# Altium PCB PCBintentoFinalUlt.PcbDoc
Units mil, origin at the board's own origin, x right, y up, seen from the top; angles counter-clockwise.
Board outline 2900 x 4000 mil, 2 copper layers (Top Layer, Bottom Layer); 36 components, 31 nets, 173 pads, 9 vias.
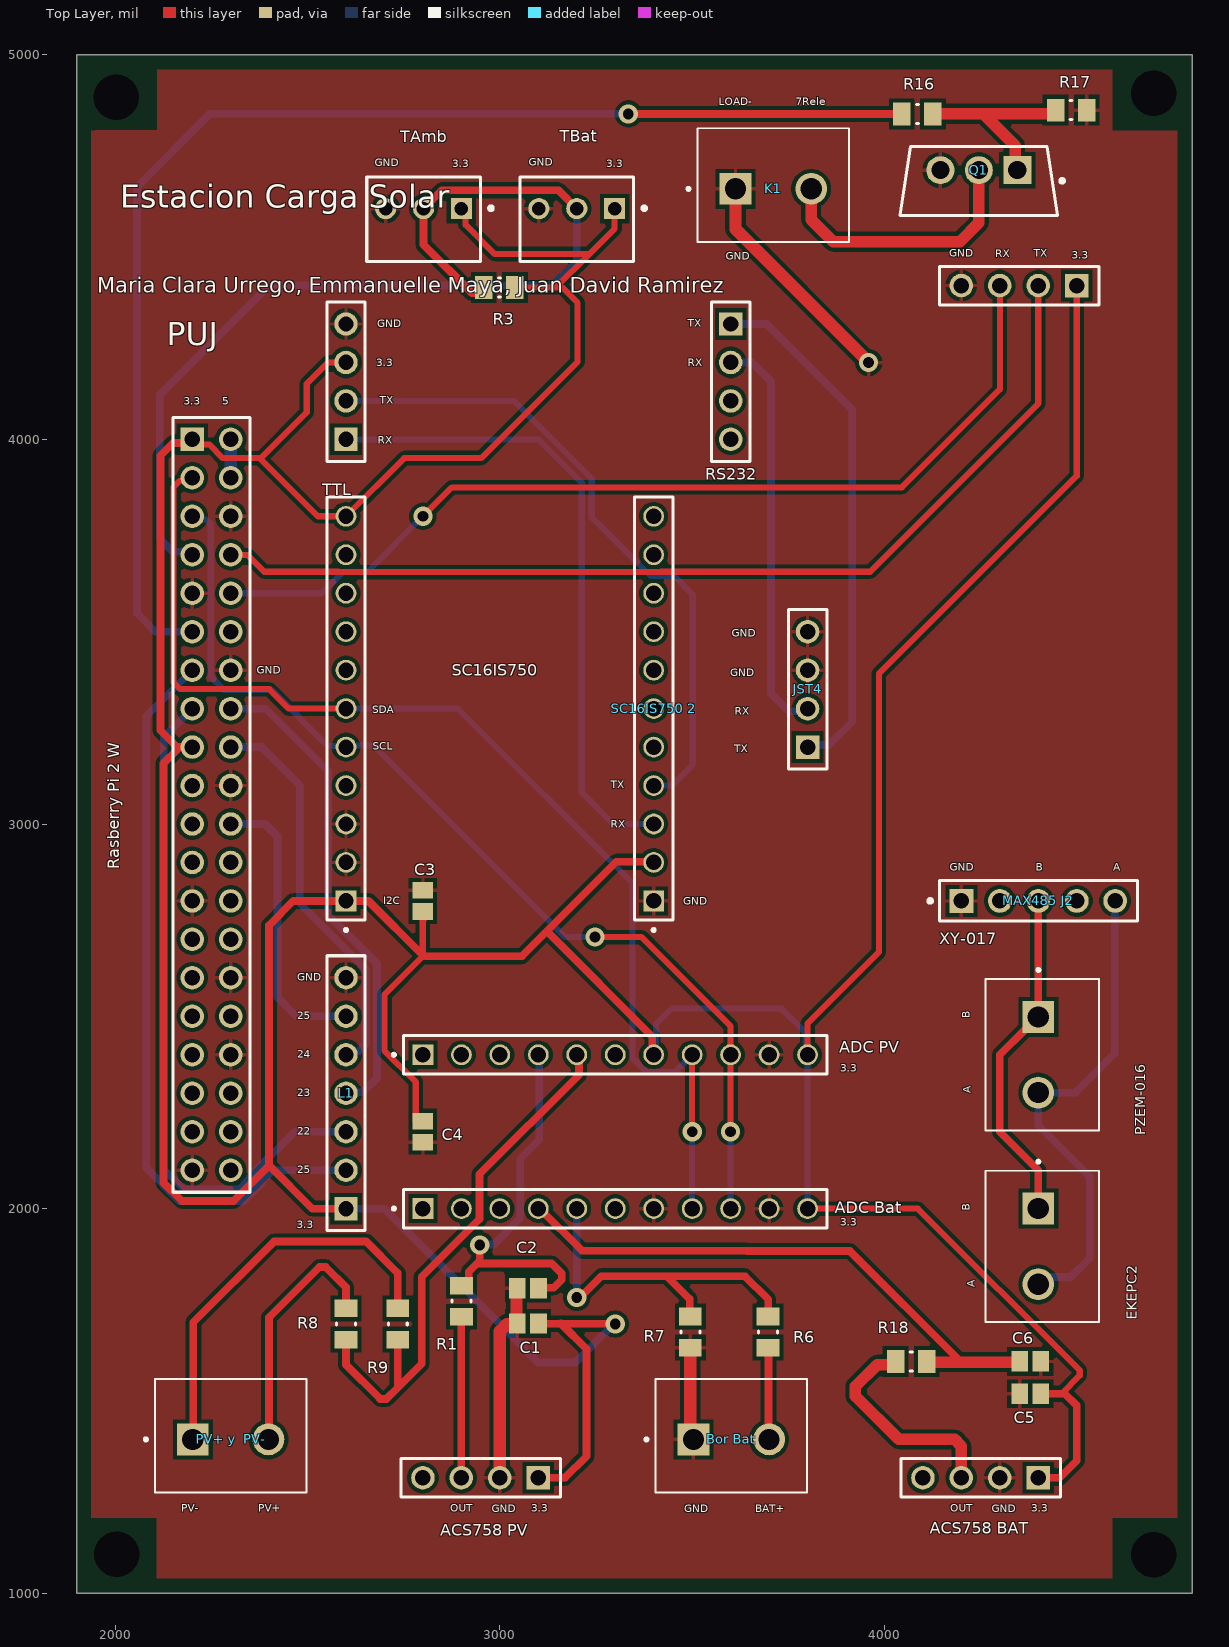
[diagram p0: Top Layer view]
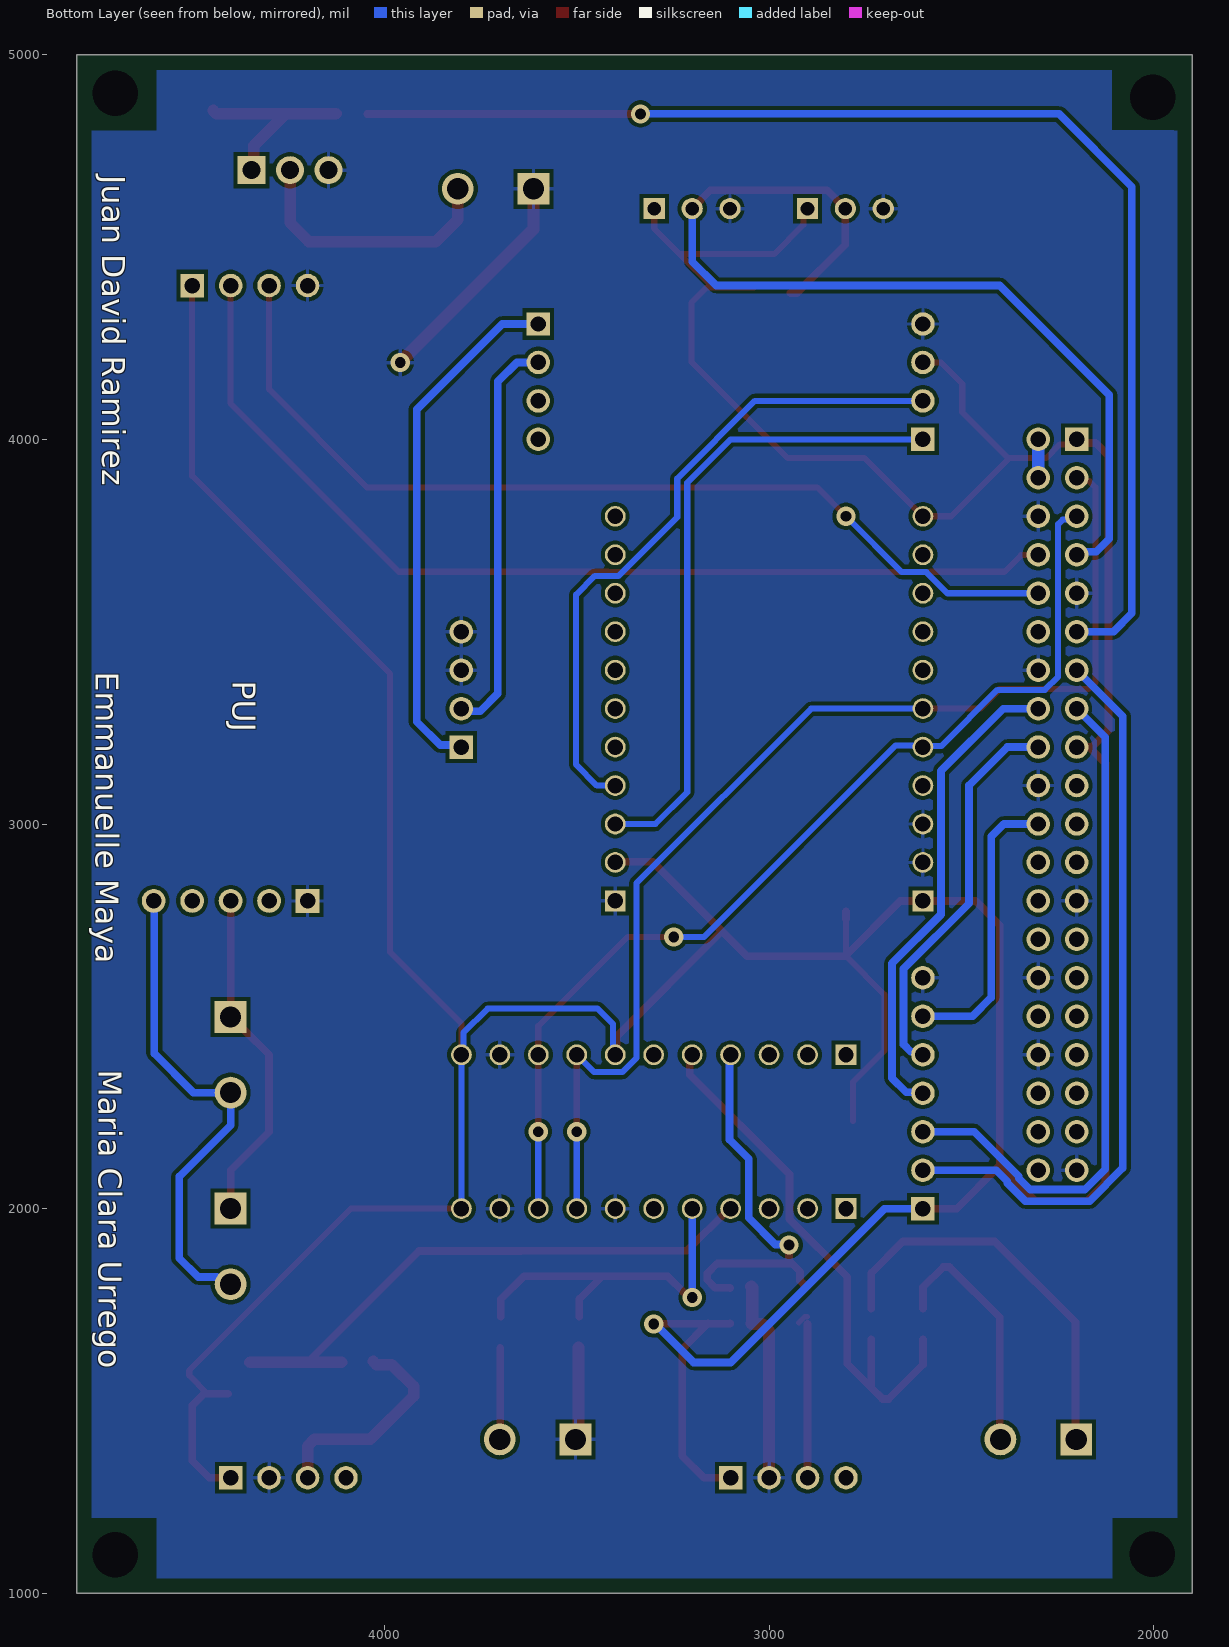
[diagram p1: Bottom Layer view, seen from below]
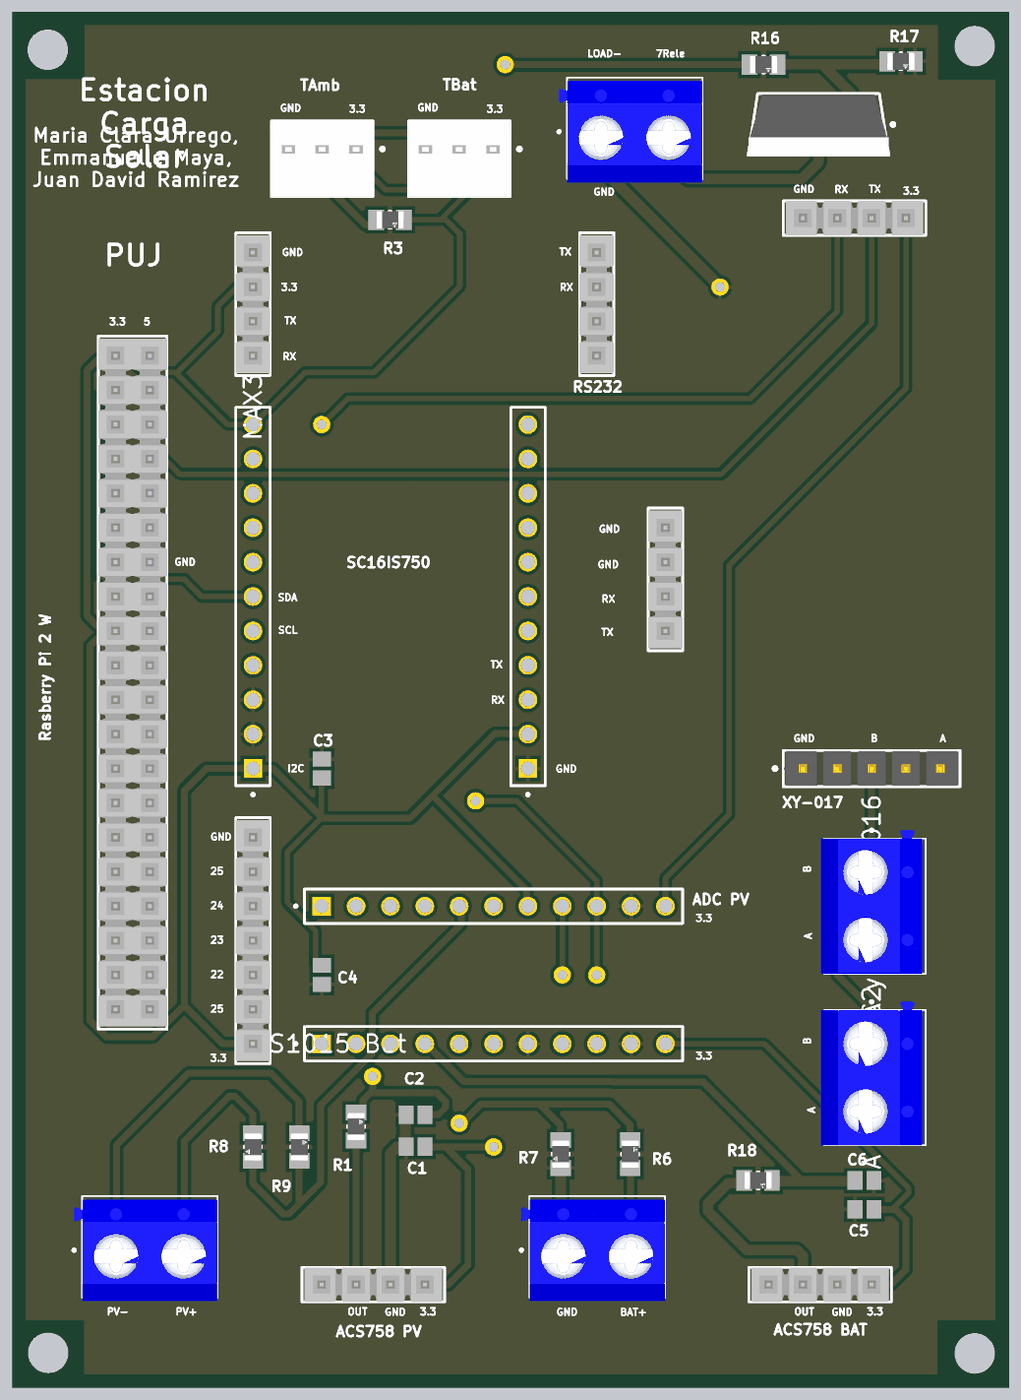
[diagram p2: 3D render of the assembled board from above, using the file's embedded part models]

## Layer stack, top to bottom
Top Solder: solder mask 0.4, Solder Resist, Dk 3.5
Top Layer: signal copper 1.4
Dielectric 1: dielectric 12.6, FR-4, Dk 4.8
Bottom Layer: signal copper 1.4
Bottom Solder: solder mask 0.4, Solder Resist, Dk 3.5

## Board outline
1900,5000 4800,5000 4800,1000 1900,1000

## Design rules (kind name [scope] priority, off if disabled: settings)
AcuteAngle [All] p1: minimum=4.50000000000000E+0001 checktracksonly=FALSE
BoardOutlineClearance [All] p1: gap=31.5 ignorepadtopadclearanceinfootprint=FALSE
Clearance [All] p1: gap=10 ignorepadtopadclearanceinfootprint=FALSE
HoleSize [All] p1: absolutevalues=TRUE maxlimit=393.7 minlimit=15.75 maxpercent=80.000 minpercent=20.000
MinimumAnnularRing [All] p1: minimumring=10
PolygonConnect [All] p1: connectstyle=Relief reliefconductorwidth=10 reliefentries=4 polygonreliefangle="90 Angle" airgapwidth=10
RoutingVias [All] p1: holewidth=28 width=50 viastyle="Through Hole" minholewidth=28 minwidth=50 maxholewidth=28 maxwidth=50
SolderMaskExpansion [All] p1: expansion=0 istentingtop=FALSE
SupplyNets "Schematic Supply Nets_2" [InNet('GND')] p1: voltage=0.000
SupplyNets "Schematic Supply Nets_7" [InNet('+3.3')] p2: voltage=0.000
SupplyNets "Schematic Supply Nets_5" [InNet('PV-')] p3: voltage=0.000
SupplyNets "Schematic Supply Nets_4" [InNet('+5')] p4: voltage=0.000
SupplyNets "Schematic Supply Nets_3" [InNet('PV+')] p5: voltage=0.000
SupplyNets "Schematic Supply Nets" [InNet('BAT+')] p6: voltage=0.000
Width [All] p1: maxlimit=40 minlimit=9.84 preferedwidth=32 minimp=50.000000 maximp=50.000000 favimp=50.000000
29 further rules are at their usual default settings.

## Classes and differential pairs
component class Esquematico_Tesis: "ACS758 BAT" "ACS758 PV" "ADC PV" "Bor Bat" C1 C2 C3 C4 C5 C6 EKEPC2 JST4 L1 "MAX485 J2" "PV+ y  PV-" PZEM-016 Q1 R1 R3 R6 R7 R8 R9 R16 R17 R18 "Rasberry Pi 2 W" RS232 SC16IS750 "SC16IS750 2" Tamb TBat TTL XY-017

## Components (designator, comment, footprint, x,y, rotation, side; value= is the part's Value field where it differs from the comment)
"ACS758 BAT" "Header 4" SMTC-TSW-104-08-X-S 4400,1300 r180 top (schematic designator "ACS758 I_BAT")
"ACS758 PV" "Header 4" SMTC-TSW-104-08-X-S 3100,1300 r180 top (schematic designator "ACS758 I_PV")
"ADC Bat" "Header 11" SAMTEC_TSW-111-24-S-S 2800,2000 r0 top (schematic designator "ADS1015 Bat")
"ADC PV" "Header 11" SAMTEC_TSW-111-24-S-S 2800,2400 r0 top (schematic designator "ADS1015 Panel")
"Bor Bat" "Bornera 2" HANDSON_KF301-2P 3601.57,1400 r0 top
C1 "C0805 0.1u" CAPC2013X88X50LL20T25 3073.03,1701.27 r0 top
C2 "C0805 10n" CAPC2013X88X50LL20T25 3073.03,1793.39 r180 top
C3 "C0805 0.1u" CAPC2013X88X50LL20T25 2800,2800 r270 top
C4 "C0805 0.1u" CAPC2013X88X50LL20T25 2800,2200 r90 top
C5 "C0805 0.1u" CAPC2013X88X50LL20T25 4379.05,1518.88 r0 top
C6 "C0805 10n" CAPC2013X88X50LL20T25 4379.05,1602.63 r0 top
EKEPC2 "Bornera 2" HANDSON_KF301-2P 4400,1901.57 r270 top (schematic designator "A y B EKEPC2")
JST4 "Header 4" SMTC-TSW-104-08-X-S 3800,3200 r90 top
K1 "Bornera 2" HANDSON_KF301-2P 3711.01,4651.43 r0 top
L1 "TSW-107-05-G-S" SMTC-TSW-107-05-X-S 2600,2000 r90 top
"MAX485 J2" "Header 5" FP-TSW-105-22-G-S-MFG 4400,2800 r0 top
"PV+ y  PV-" "Bornera 2" HANDSON_KF301-2P 2300,1400 r0 top
PZEM-016 "Bornera 2" HANDSON_KF301-2P 4400,2400 r270 top (schematic designator "A y B PZEM-016")
Q1 "IRLZ44NPbF" FP-PG-TO220-3-MFG 4245.42,4672.24 r270 top
R1 "R0805 1K" FP-MCU0805-IPC_A 2900,1759.58 r90 top
R3 "R0805 4.7K" FP-MCU0805-IPC_A 2998.86,4395.24 r0 top
R6 "R0805 51K" FP-MCU0805-IPC_A 3697.54,1679.07 r90 top
R7 "R0805 10K" FP-MCU0805-IPC_A 3495.24,1679.07 r270 top
R8 "R0805 200K" FP-MCU0805-IPC_A 2600,1700 r270 top
R9 "R0805 10K" FP-MCU0805-IPC_A 2734.65,1700 r90 top
R16 "R0805 100" FP-MCU0805-IPC_A 4085.56,4846.11 r0 top
R17 "R0805 100k" FP-MCU0805-IPC_A 4485.31,4855.96 r0 top
R18 "R0805 1K" FP-MCU0805-IPC_A 4069.41,1602.63 r0 top
"Rasberry Pi 2 W" "Header Hembra-Macho 40x2" SMTC-TSW-120-24-X-D 2200,4000 r270 top
RS232 "Header 4" SMTC-TSW-104-08-X-S 3600,4300 r270 top (schematic designator "MAX3232 RS232")
SC16IS750 "Header 11" SAMTEC_TSW-111-24-S-S 2600,2800 r90 top (schematic designator "SC16IS750 1")
"SC16IS750 2" "Header 11" SAMTEC_TSW-111-24-S-S 3400,2800 r90 top
TAmb "Header 3 pin" FP-B3P-SHF-1AA_LF_SN-MFG 2801.57,4572.44 r180 top (schematic designator "DS18B20 Amb")
TBat "Header 3 pin" FP-B3P-SHF-1AA_LF_SN-MFG 3200,4572.44 r180 top (schematic designator "DS18B20 Bat")
TTL "Header 4" SMTC-TSW-104-08-X-S 2600,4000 r90 top (schematic designator "MAX3232 TTL")
XY-017 "Header 4" SMTC-TSW-104-08-X-S 4500,4400 r180 top (schematic designator "MAX485 J1")

## Footprints (in the part's own frame and the unit in brackets; to place one, negate y for a bottom-side part, rotate by r counter-clockwise, add the part's x,y. Pads: shape width x height; smd on the part's side, far side on the other; paste and mask are expansions set on the pad)
CAPC2013X88X50LL20T25 [mm] "Chip Capacitor, 2-Leads, Body 2.00x1.25mm, IPC High Density"
  rect 1.1x1.35 smd: 1(-0.7,0) 2(0.7,0)
  body extent -1.1,-0.72 1.1,0.72, height 0.88
FP-B3P-SHF-1AA_LF_SN-MFG [mm]
  rect 1.4x1.4 hole 0.9 paste-2539.97 mask+0: 1(-2.5,-0.7)
  round 1.4 hole 0.9 paste-2539.97 mask+0: 2(0,-0.7) 3(2.5,-0.7)
  silkscreen extent -4.58,-2.8 3.75,2.8, body extent -3.85,-2.9 3.85,2.9, height 0.25
FP-MCU0805-IPC_A [mil]
  rect 45.62x59.38 smd paste+0 mask+0: 1(-40.42,0) 2(40.42,0)
  silkscreen extent -3,-25 3,25, body extent -83,-49 83,49, height 10
FP-PG-TO220-3-MFG [mm]
  rect 1.85x1.85 hole 1.2 paste-2539.97 mask+0: 1(-0.705,2.54)
  round 1.85 hole 1.2 paste-2539.97 mask+0: 2(-0.705,0) 3(-0.705,-2.54)
  silkscreen extent -2.27,-5.2 2.27,5.63, body extent -2.37,-5.55 2.37,5.55, height 0.25
FP-TSW-105-22-G-S-MFG [mm]
  rect 1.57x1.57 hole 1.02 paste-2539.97 mask+0: 1(-5.08,0)
  round 1.57 hole 1.02 paste-2539.97 mask+0: 2(-2.54,0) 3(0,0) 4(2.54,0) 5(5.08,0)
  silkscreen extent -7.26,-1.34 6.54,1.34, body extent -6.64,-1.44 6.64,1.44, height 0.25
HANDSON_KF301-2P [mm]
  rect 2.1x2.1 / inner round 2.1 / far side rect 2.1x2.1 hole 1.4: 1(-2.5,0)
  round 2.1 hole 1.4: 2(2.5,0)
  silkscreen extent -5.7,-3.5 5,4, body extent -5.6,-3.75 5,3.75, height 10
SAMTEC_TSW-111-24-S-S [mm]
  rect 1.37x1.37 hole 1.02: 01(0,0)
  round 1.37 hole 1.02: 02(2.54,0) 03(5.08,0) 04(7.62,0) 05(10.16,0) 06(12.7,0) 07(15.24,0) 08(17.78,0) 09(20.32,0) 10(22.86,0) 11(25.4,0)
  silkscreen extent -2.02,-1.27 26.67,1.27
SMTC-TSW-104-08-X-S [mm] ".025 SQ Post Terminal Strip Assembly, 1x4 Pins, Vertical, 2.54mm Pitch, Male"
  rect 1.55x1.55 hole 1.02: 1(0,0)
  round 1.55 hole 1.02: 2(2.54,0) 3(5.08,0) 4(7.62,0)
  silkscreen extent -1.46,-1.27 9.08,1.27, body extent -1.27,-1.27 8.89,1.27, height 8.38
SMTC-TSW-107-05-X-S [mm] ".025 SQ Post Terminal Strip Assembly, 1x7 Pins, Vertical, 2.54mm Pitch, Male"
  rect 1.55x1.55 hole 1.02: 1(0,0)
  round 1.55 hole 1.02: 2(2.54,0) 3(5.08,0) 4(7.62,0) 5(10.16,0) 6(12.7,0) 7(15.24,0)
  silkscreen extent -1.46,-1.27 16.7,1.27, body extent -1.27,-1.27 16.51,1.27, height 5.21
SMTC-TSW-120-24-X-D [mm] ".025 SQ Post Terminal Strip Assembly, 2x20 Pins, Vertical, 2.54mm Pitch, Male"
  rect 1.55x1.55 hole 1.02: 1(0,0)
  round 1.55 hole 1.02: 2(0,2.54) 3(2.54,0) 4(2.54,2.54) 5(5.08,0) 6(5.08,2.54) 7(7.62,0) 8(7.62,2.54) 9(10.16,0) 10(10.16,2.54) 11(12.7,0) 12(12.7,2.54) 13(15.24,0) 14(15.24,2.54) 15(17.78,0) 16(17.78,2.54) 17(20.32,0) 18(20.32,2.54) 19(22.86,0) 20(22.86,2.54) 21(25.4,0) 22(25.4,2.54) 23(27.94,0) 24(27.94,2.54) 25(30.48,0) 26(30.48,2.54) 27(33.02,0) 28(33.02,2.54) 29(35.56,0) 30(35.56,2.54) 31(38.1,0) 32(38.1,2.54) 33(40.64,0) 34(40.64,2.54) 35(43.18,0) 36(43.18,2.54) 37(45.72,0) 38(45.72,2.54) 39(48.26,0) 40(48.26,2.54)
  silkscreen extent -1.46,-1.27 49.72,3.81, body extent -1.27,-1.27 49.53,3.81, height 9.27

## Part data
"ACS758 BAT" "ACS758 PV" JST4 RS232 TTL XY-017: library part CMP-1024-00358-1, "0.025\" SQ Post Header, Through-hole, Vertical, -55 to 125 degC, 2.54 mm Pitch, 4-Pin, Male, RoHS", Manufacturer=Samtec, PartNumber=TSW-104-08-L-S, Temperature Range="-55 to 125 degC", ComponentLink1Description="Manufacturer URL", ComponentLink1URL=http://www.samtec.com, ComponentLink2Description=Datasheet, ComponentLink2URL=http://www.samtec.com/documents/webfiles/pdf/TSW_TH.PDF, ComponentLink3Description="Package Specification", ComponentLink3URL=http://www.samtec.com/documents/webfiles/cpdf/TSW-XXX-XX-XXX-X-XX-XXX-MKT.pdf, DatasheetVersion=F-214, Mounting Technology=Through-hole, Orientation=Vertical, PackageDescription=".025[0.64] SQ. Post Terminal Strip Assembly", PackageReference=TSW-104-08-X-S, PackageVersion="DM, 8/1988", Pitch="2.54 mm", RoHS=True
"ADC Bat" "ADC PV" SC16IS750 "SC16IS750 2": library part TSW-111-24-S-S, Package=None, Availability=Unavailable, MP=TSW-111-24-S-S, Price=None
"Bor Bat" EKEPC2 K1 "PV+ y  PV-" PZEM-016: library part KF301-2P, "2 Pin Terminal Block 5mm Pitch", Package=None, Check_prices=https://www.snapeda.com/parts/KF301-2P/Handson+Technology/view-part/?ref=eda, MF="Handson Technology", MP=KF301-2P, SnapEDA_Link=https://www.snapeda.com/parts/KF301-2P/Handson+Technology/view-part/?ref=snap
C1 C2 C3 C4 C5 C6: library part CMP-2007-00655-1, Manufacturer=Kemet, Part Number=C0805X103J5GACTU
L1: library part CMP-1024-00400-1, "0.025\" SQ Post Header, Through-hole, Vertical, -55 to 125 degC, 2.54 mm Pitch, 7-Pin, Male, RoHS", Manufacturer=Samtec, Temperature Range="-55 to 125 degC", ComponentLink1Description="Manufacturer URL", ComponentLink1URL=http://www.samtec.com, ComponentLink2Description=Datasheet, ComponentLink2URL=http://www.samtec.com/documents/webfiles/pdf/TSW_TH.PDF, ComponentLink3Description="Package Specification", ComponentLink3URL=http://www.samtec.com/documents/webfiles/cpdf/TSW-XXX-XX-XXX-X-XX-XXX-MKT.pdf, DatasheetVersion=F-214, Mounting Technology=Through-hole, Orientation=Vertical, PackageDescription=".025[0.64] SQ. Post Terminal Strip Assembly", PackageReference=TSW-107-05-X-S, PackageVersion="DM, 8/1988", PartNumber=TSW-107-05-G-S, Pitch="2.54 mm", RoHS=True
"MAX485 J2": library part CMP-02766-000105-1, "CONN HEADER VERT 5POS 2.54MM", Contact Material=Bronze, Contact Plating=Gold, Gender=Male, Mount="Through Hole", Number Of Contacts=5, Number Of Rows=1, REACH SVHC="No SVHC", Termination="Through Hole"
Q1: library part CMP-32901-000488-1, "MOSFET N-CH 55V 47A TO220AB", Case/Package=TO-220, Continuous Drain Current (ID)=47A, Drain to Source Breakdown Voltage=55V, Drain to Source Resistance=35mR, Gate to Source Voltage (Vgs)=16V, Input Capacitance=1.7nF, Max Operating Temperature=175°C, Max Power Dissipation=110W, Min Operating Temperature=-55°C, Threshold Voltage=2V, Drain to Source Voltage (Vdss)=55V, Element Configuration=Single, Halogen Free="Halogen Free", Height=0.6inch, Lead Free="Lead Free", Length=0.414inch, Max Dual Supply Voltage=55V, Mount="Through Hole", Number of Pins=3, Packaging=Rail/Tube, Power Dissipation=110W, Rds On Max=22mR, REACH SVHC="No SVHC", RoHS Compliant=Yes, Turn-Off Delay Time=26ns, Turn-On Delay Time=11ns, Width=0.185inch
R1 R3 R6 R7 R8 R9 R16 R17 R18: library part CMP-02407-009864-1, "RES 1.05K OHM 0.5% 1/5W 0805", Case/Package=0805, Max Operating Temperature=125°C, Max Power Dissipation=125mW, Min Operating Temperature=-55°C, Package Quantity=1000, Resistance=1kR, Temperature Coefficient=25ppm/°C, Tolerance=0.1%, Voltage Rating (DC)=100V, Composition="Thin Film", Contact Plating=Tin, Depth=1.25mm, Height=0.022inch, Lead Free="Lead Free", Length=0.079inch, Military Standard=Not, Number of Terminations=2, Packaging="Tape and Reel", Radiation Hardening=No, Width=0.049inch
"Rasberry Pi 2 W": library part CMP-1024-00451-1, "0.025\" SQ Post Header, Through-hole, Vertical, -55 to 125 degC, 2.54 mm Pitch, 40-Pin, Male, RoHS", Manufacturer=Samtec, PartNumber=TSW-120-24-G-D, Temperature Range="-55 to 125 degC", ComponentLink1Description="Manufacturer URL", ComponentLink1URL=http://www.samtec.com, ComponentLink2Description=Datasheet, ComponentLink2URL=http://www.samtec.com/documents/webfiles/pdf/TSW_TH.PDF, ComponentLink3Description="Package Specification", ComponentLink3URL=http://www.samtec.com/documents/webfiles/cpdf/TSW-XXX-XX-XXX-X-XX-XXX-MKT.pdf, DatasheetVersion=F-214, Mounting Technology=Through-hole, Orientation=Vertical, PackageDescription=".025[0.64] SQ. Post Terminal Strip Assembly", PackageReference=TSW-120-24-X-D, PackageVersion="DM, 8/1988", Pitch="2.54 mm", RoHS=True
TAmb TBat: library part CMP-17439-000681-1, "CONN HEADER VERT 3POS 2.5MM", Color=Natural, Current Rating=3A, Flammability Rating="UL94 V-0", Voltage Rating=250V, Connector Type=Header, Contact Finish - Mating=TIN, Contact Material=Brass, Contact Mating Length=0.236inch, Contact Plating=Tin, Contact Shape=Square, Contact Type="Male Pin", Fastening Type=Friction, Insulation Color=Natural, Insulation Material=Nylon, Lead Free="Lead Free", Mated Stacking Heights=14.9mm, Mount="Through Hole", Number Of Contacts=3, Number of Positions=3, Number Of Rows=1, Orientation=Straight, Packaging=Bulk, Pitch=0.098inch, Series=NH, Termination=Solder

## Free pads (board coordinates)
  round 60 hole 118.11 unplated: 1(4700,4900) 2(2002.98,4889.4) 3(2004.17,1101.52) 4(4700,1100)

## Via types
v1: diameter 50, hole 28, Top Layer to Bottom Layer, 9 vias

## Nets (pads, with @x,y where several pads share a name; then routed paths per layer and width w, separated by ;. In a path a pad name is that pad's centre, name@x,y a point inside that pad or via, vN(x,y) a via of type N, cw(c..) or ccw(c..) an arc to the next point about the centre after c; other vN are vias at no path point)
7Rele: K1.2 Q1.2 | length 697.2
  Top Layer w30: K1.2 3809.43,4571.19 3866.65,4513.97 4196.4,4513.97 4245.42,4562.99 Q1.2
+3.3: "ACS758 BAT.1" "ACS758 PV.1" "ADC Bat.11" "ADC PV.07" "ADC PV.11" "Rasberry Pi 2 W.1" "Rasberry Pi 2 W.17" "SC16IS750 2.02" C1.2 C3.2 C4.2 C5.2 L1.1 R3.2 SC16IS750.01 SC16IS750.11 TAmb.1 TBat.1 TTL.3 XY-017.1 | length 14350.3
  Top Layer w16: 2200,4000 2213.75,3986.25 2245.14,3986.25 2279.91,3951.49 2290.81,3951.49 2290.91,3951.38 2375.58,3951.38 2377.24,3949.72 ; TTL.3 2553.42,4200 2497.94,4144.53 2497.94,4070.43 2377.24,3949.72 ; C4.2@2781.43,2227.56 2781.43,2329.53 2700,2410.95 2700,2556.34 2799.58,2655.93 2799.58,2658.8 C3.2@2799.58,2752.34 ; TAmb.1 2910.72,4589.28 2910.72,4557.81 2986.62,4481.91 3232.14,4481.91 ; R3.2 3145.47,4395.24 ; TBat.1 3298.43,4548.07 3232.27,4481.91 3232.14,4481.91 ; 3800,2000 4087.03,2000 4507.61,1579.43 4507.61,1566.17 4460.32,1518.88 ; 3800,2400 3800,2481.33 3985.46,2666.78 3985.46,3390.59 4500,3905.13 XY-017.1 XY-017.1@4500,4412.31 ; 2377.24,3949.72 2526.96,3800 SC16IS750.11 2751.49,3951.49 2951.49,3951.49 3201.97,4201.97 3201.97,4355.05 3161.78,4395.24 3145.47,4395.24 ; 3145.47,4395.24 3232.14,4481.91
  Top Layer w20: 2161.2,3193.22 2125.51,3157.53 2125.51,2067.64 2173.17,2019.98 2307.86,2019.98 2400,2112.12 ; 2200,3200 2161.2,3200 2117.5,3243.71 2117.5,3957.05 2151.2,3990.76 2190.76,3990.76 2200,4000 ; L1.1 2512.12,2000 2400,2112.12 ; 2799.58,2655.93 3055.47,2655.93 ; 2799.58,2658.8 2658.59,2799.79 2600.21,2799.79 SC16IS750.01 2463.38,2800 2400,2736.62 2400,2112.12 ; C3.2@2800,2752.34 C3.2 ; 3057.47,2655.93 3303.17,2901.63 3398.37,2901.63 3400,2900 ; 3100,1300 3169.21,1300 3225.51,1356.3 3225.51,1634.76 3159,1701.27 ; C1.2 3101.22,1700.63 3299.37,1700.63 v1(3300,1700) ; 3123.98,2719.61 3396.65,2446.94 3396.65,2403.35 3400,2400 ; 4400,1300 4455.59,1300 4500,1344.41 4500,1488.1 4469.22,1518.88 C5.2
  Bottom Layer w16: 3400,2400 3406.06,2406.06 3406.06,2480.09 3446.06,2520.08 3731.85,2520.08 3794.84,2457.09 3794.84,2405.16 3800,2400 3800,2000
  Bottom Layer w20: L1.1 2700,2000 3100,1600 3196.28,1600 v1@3297.5,1701.22
+5: "Rasberry Pi 2 W.2" "Rasberry Pi 2 W.4" | length 99.1
  Bottom Layer w32: 2300.45,3900.45 2300.45,3999.55
A: "MAX485 J2.5" EKEPC2.2 PZEM-016.2 | length 1285.2
  Bottom Layer w20: EKEPC2.2 4416.96,1803.15 4435.98,1822.16 4484.39,1822.16 4533.59,1871.37 4533.59,2083.32 4400,2216.91 PZEM-016.2 4496.51,2301.57 4598.45,2403.51 4598.45,2798.45 4600,2800
B: "MAX485 J2.3" EKEPC2.1 PZEM-016.1 | length 894.4
  Top Layer w20: EKEPC2.1 4400,2100 4300,2200 4300,2400 4367.09,2467.09 4368.66,2467.09 PZEM-016.1 4400.02,2810.63
BAT+: "Bor Bat.2" R6.1 | length 238.8
  Top Layer w20: R6.1@3698.57,1638.23 3698.57,1401.43 3700,1400
CLK0: "Rasberry Pi 2 W.7" R3.1 TAmb.2 TBat.2 | length 2567.4
  Top Layer w20: R3.1@2944.15,4380.61 2927.52,4380.61 2801.57,4506.56 TAmb.2 2849.13,4647.56 3152.44,4647.56 TBat.2
  Bottom Layer w20: 2200,3700 2192.15,3707.85 2149.69,3707.85 2115.37,3742.16 2115.37,4115.37 2400,4400 3137.74,4400 3200,4462.26 TBat.2
"Div. Bat": "ADC Bat.05" R6.2 R7.1 | length 950.8
  Top Layer w20: v1(3200,1768.97) 3208.12,1768.97 3223.12,1783.97 3223.57,1783.97 3264.03,1824.43 3433.8,1824.43 ; R7.1@3493.42,1719.49 3493.42,1764.81 3433.8,1824.43 ; R6.2 3697.54,1764.17 3637.28,1824.43 3433.8,1824.43
  Bottom Layer w20: v1(3200,1768.97) 3200,2000
"Div. PV": "ADC PV.05" R8.2 R9.1 | length 1437.3
  Top Layer w16: 3200,2400 3205.95,2394.05
  Top Layer w20: R8.2 2600,1593.84 2688.64,1505.21 2705.21,1505.21 2734.65,1534.65 ; R9.1 2734.65,1534.65 ; 3205.95,2394.05 3205.95,2348.58 2946.97,2089.59 2946.97,1972.64 2796.66,1822.33 2796.66,1596.66 2734.65,1534.65
GND: "ACS758 BAT.2" "ACS758 PV.2" "ADC Bat.07" "ADC Bat.10" "ADC PV.10" "Bor Bat.1" "MAX485 J2.1" "Rasberry Pi 2 W.6" "Rasberry Pi 2 W.9" "Rasberry Pi 2 W.14" "Rasberry Pi 2 W.20" "Rasberry Pi 2 W.25" "Rasberry Pi 2 W.30" "Rasberry Pi 2 W.34" "Rasberry Pi 2 W.39" "SC16IS750 2.01" C1.1 C2.2 C3.1 C4.1 C5.1 C6.2 JST4.3 JST4.4 K1.1 L1.7 Q1.3 R7.2 R17.2 SC16IS750.02 SC16IS750.03 TAmb.3 TBat.3 TTL.4 XY-017.4 | length 1369.8
  Top Layer w20: 3495.45,1407.7 3503.15,1400
  Top Layer w32: 3000,1300 3000,1681.25 3018.75,1700 3044.2,1700 C1.1 3043.45,1703.29 3043.45,1794.09 C2.2@3046.25,1796.9 ; 3495.45,1407.7 R7.2@3495.45,1638.44 ; K1.1 3612.58,4546.72 v1@3959.64,4199.67
  other v1: 3958.83,4199.67
GPIO17: "Rasberry Pi 2 W.11" R16.1 | length 3338.9
  Top Layer w20: v1(3334.03,4846.3) 3334.12,4846.2 4045.04,4846.2 R16.1
  Bottom Layer w20: 2200,3500 2104.57,3500 2056.82,3547.75 2056.82,4656.82 2246.3,4846.3 v1(3334.03,4846.3)
GPIO22: "Rasberry Pi 2 W.15" L1.3 | length 1789.3
  Bottom Layer w20: 2200,3300 2125.76,3225.76 2125.76,2102.81 2179.08,2049.49 2320.92,2049.49 2350.51,2079.08 2350.51,2083.69 2466.82,2200 L1.3
GPIO23: "Rasberry Pi 2 W.16" L1.4 | length 1268.2
  Bottom Layer w20: 2300,3300 2390.99,3300 2553.03,3137.96 2553.03,2764.75 2680.51,2637.27 2680.51,2339.64 2643.23,2302.35 2602.35,2302.35 L1.4
GPIO24: "Rasberry Pi 2 W.18" L1.5 | length 1027.5
  Bottom Layer w20: 2300,3200 2381.11,3200 2480,3101.11 2480,2794.09 2650.51,2623.58 2650.51,2426.9 2631.46,2407.85 2607.85,2407.85 L1.5
GPIO25: "Rasberry Pi 2 W.22" L1.6 | length 752.1
  Bottom Layer w20: 2300,3000 2389.4,3000 2421.98,2967.43 2421.98,2549.14 2471.11,2500 L1.6
GPIO27: "Rasberry Pi 2 W.13" L1.2 | length 1935.2
  Bottom Layer w20: 2200,3400 2080.42,3280.42 2080.42,2105.72 2166.65,2019.49 2333.35,2019.49 2380.51,2066.65 2380.51,2071.27 2409.24,2100 L1.2
"NetACS758 I_BAT_3": "ACS758 BAT.3" R18.1 | length 569
  Top Layer w30: R18.1 4021.18,1594.82 4021.18,1594.43 3981.06,1594.43 3924.21,1537.58 3924.21,1512.73 4036.94,1400 4182.43,1400 4200,1382.43 4200,1300
"NetACS758 I_PV_3": "ACS758 PV.3" R1.1 | length 429.2
  Top Layer w14: R1.1 2906.88,1719.16 R1.1@2922.69,1703.35
  Top Layer w20: 2900,1300 R1.1@2900,1700
NetQ1_1: Q1.1 R16.2 R17.1 | length 506.9
  Top Layer w30: R16.2@4125.98,4846.64 4257,4846.64 ; Q1.1 4339.79,4705.63 4339.79,4763.84 4257,4846.64 ; R17.1 4444.89,4854.45 4437.08,4846.64 4257,4846.64
OU1: "ADC PV.04" C2.1 R1.2 | length 1024.2
  Top Layer w20: R1.2 2906.62,1800 2919.43,1812.81 2919.43,1835.5 2948.01,1864.08 ; v1(2948.01,1905.11) 2948.01,1892.33 2948.01,1857.55 3134.33,1857.55 3160.6,1831.27 3160.6,1814.7 3140.53,1794.63 3101.82,1794.63 C2.1
  Bottom Layer w20: v1(2948.01,1905.11) 2949.71,1906.81 2983.68,1906.81 3053.03,1976.16 3053.03,2129.33 3102.65,2178.95 3102.65,2397.35 3100,2400
OU2: "ADC Bat.04" C6.1 R18.2 | length 1587.5
  Top Layer w20: 3100,2000 3104.05,2000 3213.72,1890.32 3643.34,1890.32 3644.06,1889.6 3910.4,1889.6 4197.37,1602.63 R18.2
  Top Layer w30: R18.2@4111.68,1600.79 C6.1@4349.64,1600.79
PV+: "PV+ y  PV-.2" R8.1 | length 648.2
  Top Layer w20: 2400,1400 2400,1717.06 2530.96,1848.02 2547.53,1848.02 2600,1795.54 R8.1
PV-: "PV+ y  PV-.1" R9.2 | length 1049
  Top Layer w20: 2203.15,1400 2203.15,1704.58 2413.02,1914.45 2652.68,1914.45 2734.65,1832.47 R9.2
RX232: JST4.2 RS232.2 | length 1056.3
  Bottom Layer w20: RS232.2 3655.46,4200 3705.07,4150.39 3705.07,3339.29 3751.2,3293.15 3793.15,3293.15 JST4.2@3801.91,3301.91
RXTTL: "SC16IS750 2.03" TTL.1 | length 1685.6
  Bottom Layer w16: TTL.1 3100,4000 3212.9,3887.1 3212.9,3082.47 3295.37,3000 3400,3000
SCL: "ADC Bat.09" "ADC PV.09" "Rasberry Pi 2 W.5" SC16IS750.05 | length 2659.6
  Top Layer w16: v1(3247.66,2706.01) 3368.49,2706.01 3600,2474.5 3600,2400 v1(3600,2200)
  Bottom Layer w16: 2200,3800 2208.46,3791.54 2236.63,3791.54 2248.51,3779.65 2248.51,3382.88 2282.88,3348.51 2406.37,3348.51 2552.53,3202.35 2597.65,3202.35 SC16IS750.05 2604.4,3204.4 2671.18,3204.4 3169.14,2706.44 3247.23,2706.44 v1(3247.66,2706.01) ; 3600,2000 v1(3600,2200)
SDA: "ADC Bat.08" "ADC PV.08" "Rasberry Pi 2 W.3" SC16IS750.06 | length 3019
  Top Layer w16: 2200,3900 2191.39,3891.39 2166.92,3891.39 2151.49,3875.95 2151.49,3368.72 2169.64,3350.57 2400.44,3350.57 2451.01,3300 SC16IS750.06 ; v1(3500,2200) 3500,2400
  Bottom Layer w16: SC16IS750.06 2890.92,3300 3344.97,2845.95 3344.97,2391.44 3381.37,2355.03 3455.03,2355.03 3500,2400 ; 3500,2000 v1(3500,2200)
TX232: JST4.1 RS232.1 | length 1376.5
  Bottom Layer w20: RS232.1 3693.97,4300 3916.22,4077.75 3916.22,3266.27 3855.28,3205.33 JST4.1@3784.7,3205.33
TXTTL: "SC16IS750 2.04" TTL.2 | length 1735.3
  Bottom Layer w16: TTL.2 3036.77,4100 3238.9,3897.87 3238.9,3797.5 3391.44,3644.97 3452.86,3644.97 3501.72,3596.1 3501.72,3154.27 3447.45,3100 3400,3100
UART0_RX: "Rasberry Pi 2 W.10" XY-017.3 | length 2466.2
  Top Layer w16: v1(2800,3800) 2875.19,3875.19 4045.48,3875.19 4300,4129.71 XY-017.3@4300,4376.47
  Bottom Layer w16: 2300,3600 2536.41,3600 2591.44,3655.03 2655.03,3655.03 v1(2800,3800)
UART0_TX: "Rasberry Pi 2 W.8" XY-017.2 | length 2607.1
  Top Layer w16: 2300,3700 2300.81,3699.19 2344.28,3699.19 2387.57,3655.9 2580.5,3655.9 2581.37,3655.03 3418.63,3655.03 3419.5,3655.9 3963.04,3655.9 4400,4092.86 XY-017.2
pads on no net: "ACS758 BAT.4" "ACS758 PV.4" "ADC Bat.01" "ADC Bat.02" "ADC Bat.03" "ADC Bat.06" "ADC PV.01" "ADC PV.02" "ADC PV.03" "ADC PV.06" "MAX485 J2.2" "MAX485 J2.4" "Rasberry Pi 2 W.12" "Rasberry Pi 2 W.19" "Rasberry Pi 2 W.21" "Rasberry Pi 2 W.23" "Rasberry Pi 2 W.24" "Rasberry Pi 2 W.26" "Rasberry Pi 2 W.27" "Rasberry Pi 2 W.28" "Rasberry Pi 2 W.29" "Rasberry Pi 2 W.31" "Rasberry Pi 2 W.32" "Rasberry Pi 2 W.33" "Rasberry Pi 2 W.35" "Rasberry Pi 2 W.36" "Rasberry Pi 2 W.37" "Rasberry Pi 2 W.38" "Rasberry Pi 2 W.40" "SC16IS750 2.05" "SC16IS750 2.06" "SC16IS750 2.07" "SC16IS750 2.08" "SC16IS750 2.09" "SC16IS750 2.10" "SC16IS750 2.11" RS232.3 RS232.4 SC16IS750.04 SC16IS750.07 SC16IS750.08 SC16IS750.09 SC16IS750.10

## Polygon pours and split planes (outlines as drawn)
GND on Top Layer "NONET_L02_P-001" (solid, pour order 0): 1908.44,5011.24 1900,5002.81 1900,1000 4800,1000 4800,5000
GND on Bottom Layer "NONET_L02_P-001" (solid, pour order 1): 1866.82,4959.9 4759.9,4959.9 4800,5000 4800,1000 1919.68,1000 1900,1019.68

## Other copper
Multi-Layer:
  pour cut-out: 1900,1000 4800,1000 4800,1039.37 1900,1039.37
  pour cut-out: 4800,5000 4800,1000 4760.63,1000 4760.63,5000
  pour cut-out: 1900,5000 1900,4960.55 4800,4960.55 4800,5000
  pour cut-out: 4592.46,4999.58 4800.33,4999.58 4800.33,4802.73 4592.46,4802.73
  pour cut-out: 1898.88,4803.08 1938.25,4803.08 1938.25,999.93 1898.88,999.93
  pour cut-out: 4591.85,999.81 4591.85,1196.61 4591.9,1196.66 4799.77,1196.66 4799.77,999.81
  pour cut-out: 1900.23,1196.26 2108.11,1196.26 2108.11,999.4 1900.23,999.4
  pour cut-out: 1901.65,5000.5 2109.52,5000.5 2109.52,4803.65 1901.65,4803.65

## Silkscreen, mask and mechanical layers (free items; w line width, h text height)
Top Overlay:
  text "LOAD-" at 3568.96,4868.83 h20
  text "7Rele" at 3768.96,4868.83 h20
  text "GND" at 3074.65,4711.64 h20
  text "GND" at 2675.21,4710.54 h20
  text "3.3" at 2876.04,4707.79 h20
  text "3.3" at 3276.04,4707.79 h20
  text "Estacion Carga Solar" at 2013.16,4601.79 h60
  text "GND" at 4168.47,4474.7 h20
  text "TX" at 4388.42,4474.7 h20
  text "RX" at 4288.17,4474.07 h20
  text "3.3" at 4487.41,4469.25 h20
  text "GND" at 3587.12,4466.74 h20
  text "Maria Clara Urrego, Emmanuelle Maya, Juan David Ramirez" at 1953.42,4381.11 h40
  text "TX" at 3487.92,4292.83 h20
  text "GND" at 2680.85,4291.24 h20
  text "PUJ" at 2134.24,4244.26 h60
  text "3.3" at 2678.21,4189.62 h20
  text "RX" at 3488.34,4189.62 h20
  text "TX" at 2687.92,4092.83 h20
  text "3.3" at 2178.21,4089.62 h20
  text "5" at 2278.21,4089.62 h20
  text "RX" at 2682.61,3988.24 h20
  text "GND" at 3602.56,3486.76 h20
  text "GND" at 2368.12,3390.78 h20
  text "GND" at 3599.22,3383.61 h20
  text "SDA" at 2668.5,3287.91 h20
  text "RX" at 3610.5,3283.6 h20
  text "SCL" at 2669.74,3192.89 h20
  text "TX" at 3610.08,3186.81 h20
  text "TX" at 3287.92,3092.83 h20
  text "RX" at 3288.34,2989.62 h20
  text "B" at 4393.61,2878.67 h20
  text "GND" at 4169.29,2877.98 h20
  text "A" at 4594.67,2877.86 h20
  text "I2C" at 2696.94,2790.85 h20
  text "GND" at 3477.05,2789.63 h20
  text "GND" at 2472.62,2592.16 h20
  text "B" at 4221.88,2494.39 h20 r90
  text "25" at 2472.62,2492.16 h20
  text "24" at 2472.62,2392.16 h20
  text "3.3" at 3884.49,2355.51 h20
  text "A" at 4224.83,2300.55 h20 r90
  text "23" at 2472.62,2292.16 h20
  text "22" at 2472.62,2192.16 h20
  text "25" at 2472.62,2092.16 h20
  text "B" at 4221.88,1994.39 h20 r90
  text "3.3" at 3884.49,1955.51 h20
  text "3.3" at 2471.97,1949.06 h20
  text "A" at 4234.28,1794.94 h20 r90
  text "PV-" at 2171.26,1211.91 h20
  text "PV+" at 2371.26,1211.91 h20
  text "OUT" at 2871.26,1211.91 h20
  text "3.3" at 3082.21,1211.78 h20
  text "OUT" at 4171.26,1211.91 h20
  text "3.3" at 4382.21,1211.78 h20
  text "GND" at 2979.45,1210.78 h20
  text "GND" at 3479.45,1210.78 h20
  text "BAT+" at 3664.38,1210.65 h20
  text "GND" at 4279.45,1210.78 h20
Bottom Overlay:
  text "Juan David Ramirez" at 4733.71,4686.93 h60 r90
  text "Emmanuelle Maya" at 4750.3,3396 h60 r90
  text "PUJ" at 4394.24,3372.85 h60 r90
  text "Maria Clara Urrego" at 4742.64,2361.61 h60 r90